# Altium PCB MainBoardPCB_BKP.PcbDoc (part 11 of 35)
Units mm, origin at the board's own origin, x right, y up, seen from the top; angles counter-clockwise.
Board outline 258.95 x 308.86 mm, 16 copper layers (L1, L2 (GND), L3 (Sign), L4 (GND), L5 (Sign), L6 (PWR/GND), L7(PWR/GND), L8 (Plane_GND), L9 (PWR/GND), L10 (PWR/GND), L11 (PWR/GND), L12 (Sign), L13 (GND), L14 (Sign), L15 (GND), L16), stack 2.502 mm thick; 2361 components, 1770 nets, 8410 pads, 3259 vias.
Unrouted connection lines stored in the file: 4700.
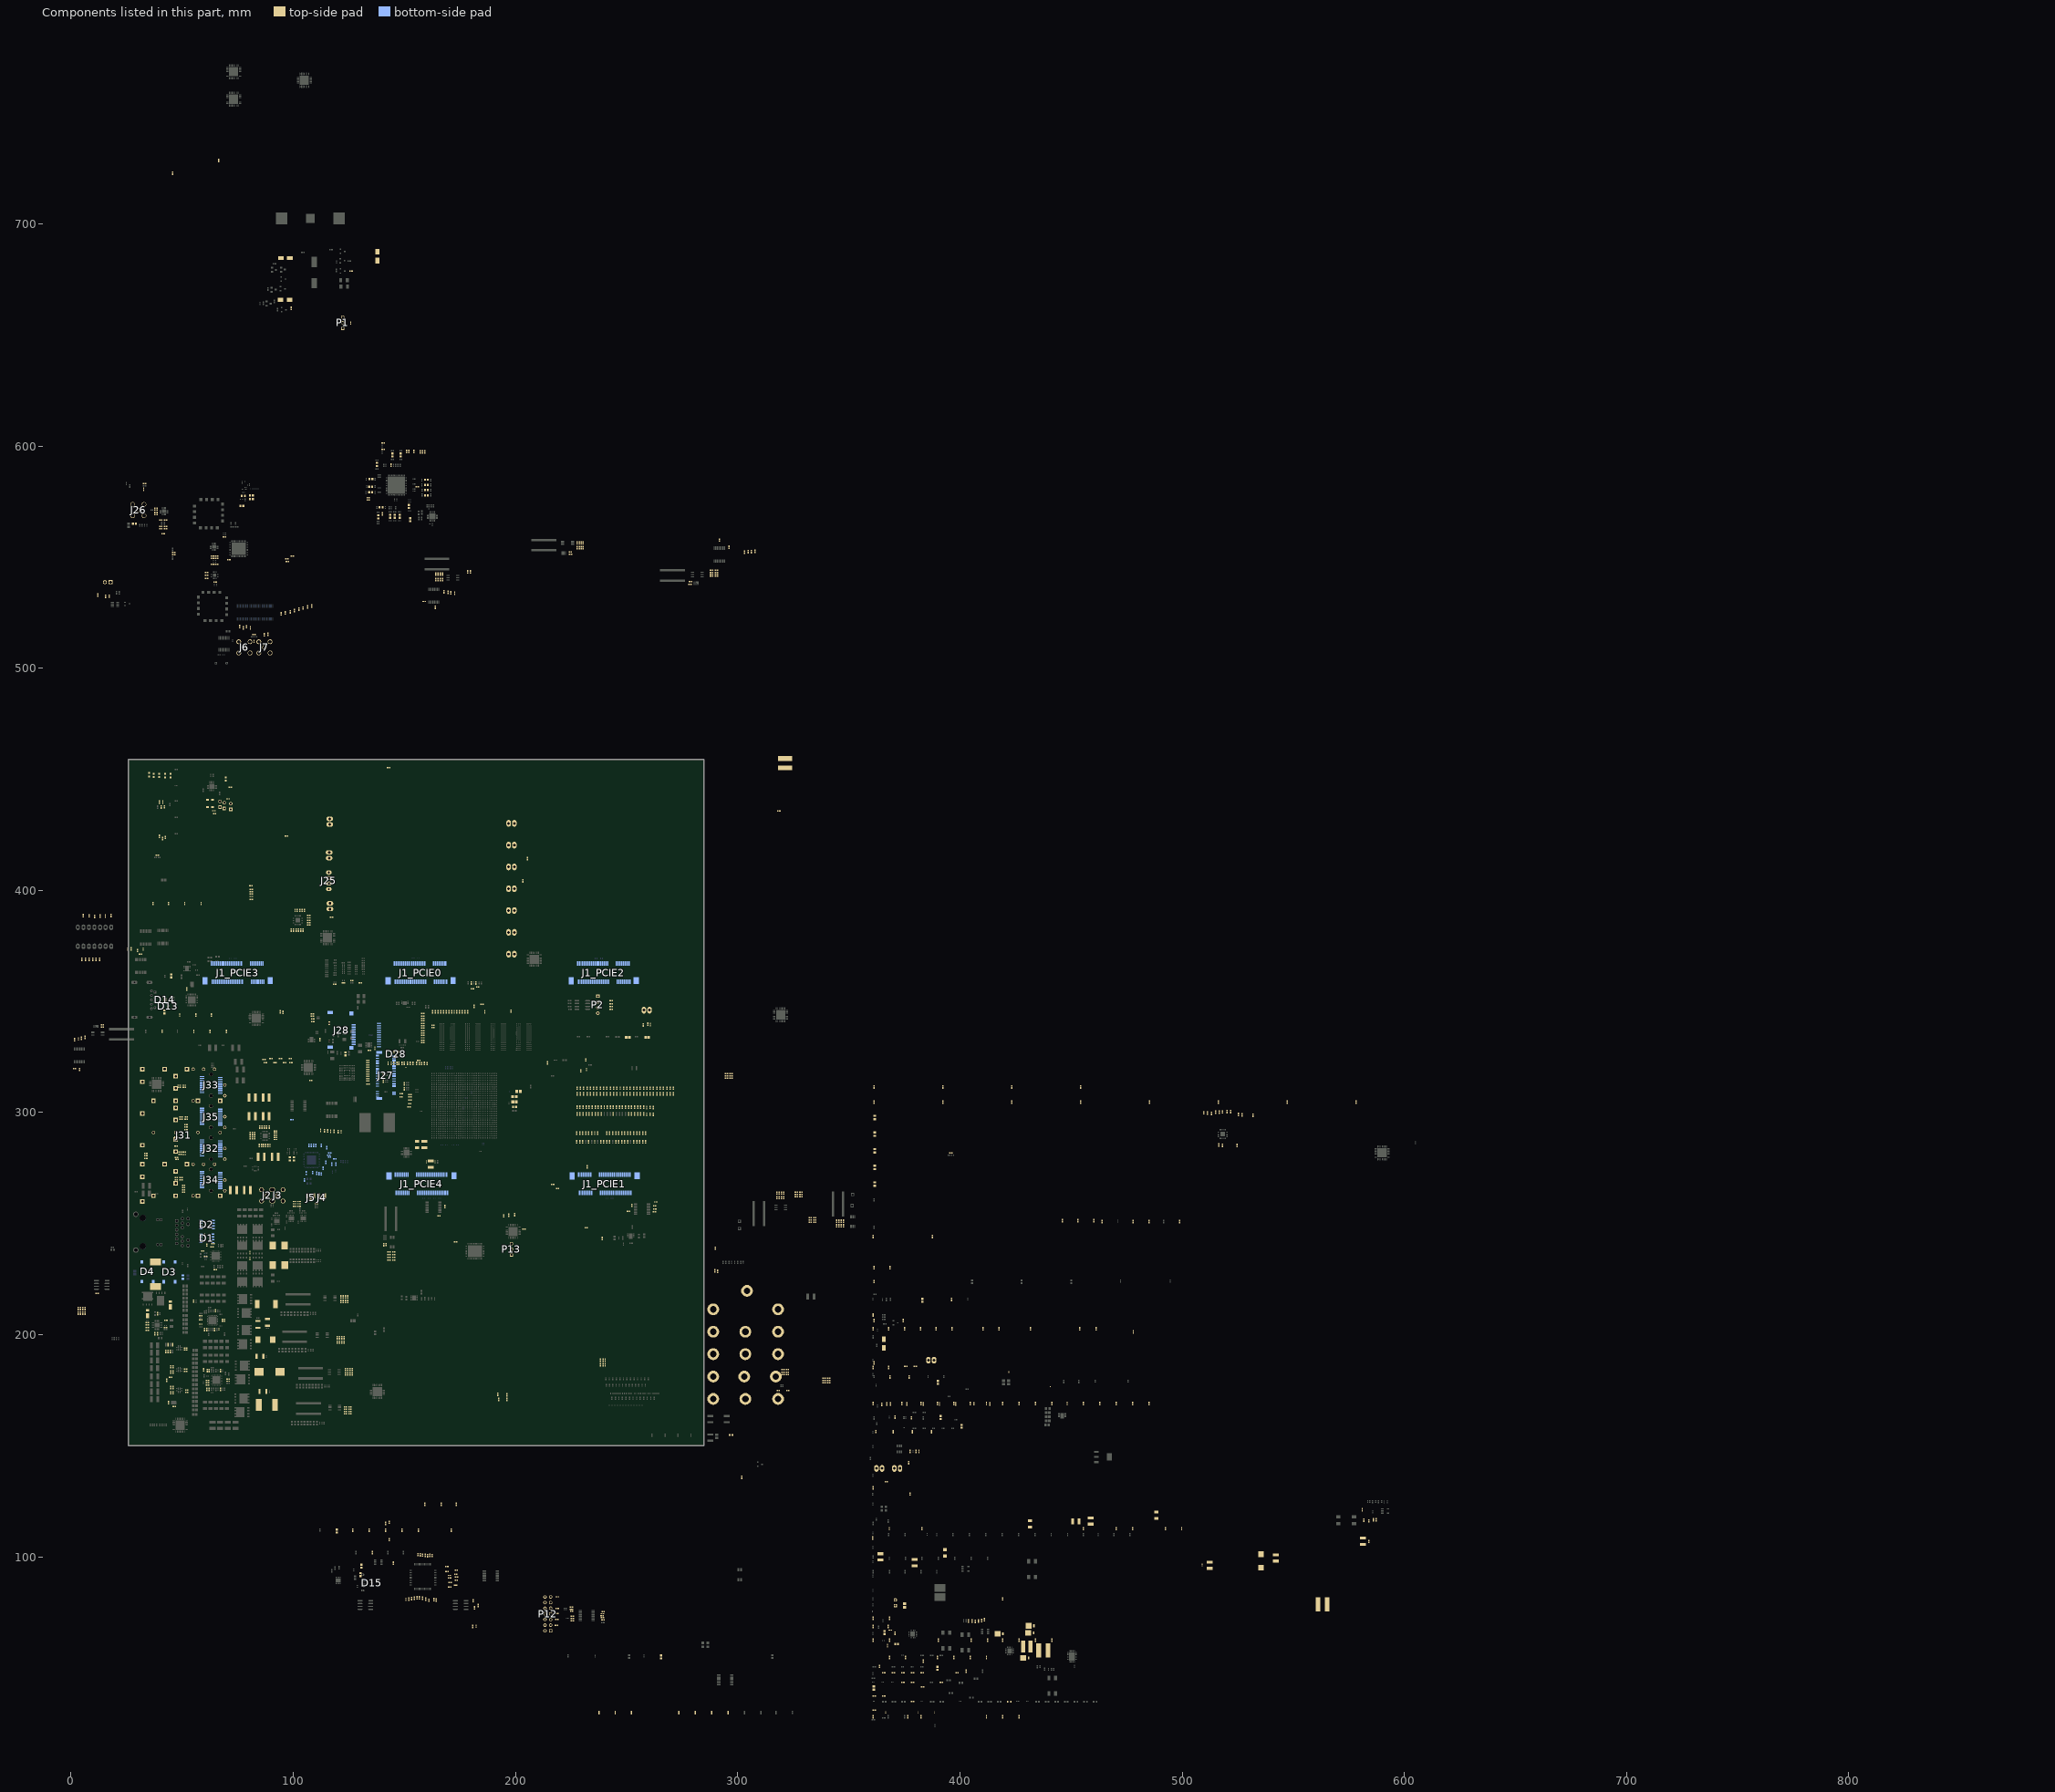
[diagram p20: the components of this part, seen from the top]

## Part data (continued)
C707 C708: library part Capacitor, "CAP CER 10UF 25V X5R 0805", Case/Package=0805, Case Code (Metric)=2012, Dielectric=X5R, Dielectric Material=Ceramic, Manufacturer=KEMET, Manufacturer Part Number=C0805C106K3PACTU, Max Operating Temperature=85°C, Min Operating Temperature=-55°C, Supplier Part Number 1=399-11939-6-ND, Tolerance=10%, Voltage=25V, Capacitance=10uF, Case Code (Imperial)=0805, Category="Ceramic Capacitors", ComponentLink1Description=http://www.farnell.com/datasheets/2741185.pdf?src-supplier=Farnell, ComponentLink1URL=http://www.farnell.com/datasheets/2741185.pdf?src-supplier=Farnell, ComponentLink2Description=http://www.farnell.com/datasheets/2112054.pdf?src-supplier=Farnell, ComponentLink2URL=http://www.farnell.com/datasheets/2112054.pdf?src-supplier=Farnell, ComponentLink3Description=http://www.alliedelec.com/m/d/f3c02ddb98afa3dd1adcb801109671e9.pdf?src-supplier=Allied+Electronics, ComponentLink3URL=http://www.alliedelec.com/m/d/f3c02ddb98afa3dd1adcb801109671e9.pdf?src-supplier=Allied+Electronics, ComponentLink4Description=http://www.farnell.com/datasheets/2112054.pdf?src-supplier=Element14, ComponentLink4URL=http://www.farnell.com/datasheets/2112054.pdf?src-supplier=Element14, ComponentLink5Description=https://api.kemet.com/component-edge/download/datasheet/C0805C106K3PAC7800.pdf?src-supplier=Digi-Key, ComponentLink5URL=https://api.kemet.com/component-edge/download/datasheet/C0805C106K3PAC7800.pdf?src-supplier=Digi-Key, ComponentLink6Description=http://www.kemet.com/docfinder?Partnumber=C0805C106K3PAC7800&src-supplier=Digi-Key, ComponentLink6URL=http://www.kemet.com/docfinder?Partnumber=C0805C106K3PAC7800&src-supplier=Digi-Key, ComponentLink7Description=http://www.kemet.com/Lists/ProductCatalog/Attachments/19/KEM_C1006_X5R_SMD.pdf?src-supplier=Avnet, ComponentLink7URL=http://www.kemet.com/Lists/ProductCatalog/Attachments/19/KEM_C1006_X5R_SMD.pdf?src-supplier=Avnet, Depth=1.25mm, Dissipation Factor=10%, Height=1.25mm, Lead Free="Lead Free", Length=0.079inch, Mount="Surface Mount", Packaging="Cut Tape", Pricing 1="1=0,24000, 10=0,16800, 100=0,09510, 500=0,06710, 1000=0,05872 (USD)", REACH SVHC="No SVHC", RoHS=Yes, Stock 1=4800, Supplier 1=Digi-Key, Termination=Solder, Thickness=0.057inch, Voltage Rating=25V, Voltage Rating (DC)=25V, Width=0.049inch
C714: library part Capacitor, "CAP CER 0.33UF 25V Y5V 0603", Case Code (Imperial)=0603, Case Code (Metric)=1608, Dielectric=Y5V, Dielectric Material=Ceramic, Manufacturer=KEMET, Manufacturer Part Number=C0603C334Z3VACTU, Max Operating Temperature=85°C, Min Operating Temperature=-30°C, Package Quantity=1, Supplier Part Number 1=399-1292-1-ND, Tolerance=80%, Voltage Rating=25V, Capacitance=330nF, Case/Package=0603, Category="Ceramic Capacitors", ComponentLink1Description=https://datasheet.ciiva.com/7378/1470417-7378528.pdf?src-supplier=Newark, ComponentLink1URL=https://datasheet.ciiva.com/7378/1470417-7378528.pdf?src-supplier=Newark, ComponentLink2Description=https://datasheet.ciiva.com/18193/getdatasheetpartid-220793-18193020.pdf?src-supplier=Verical, ComponentLink2URL=https://datasheet.ciiva.com/18193/getdatasheetpartid-220793-18193020.pdf?src-supplier=Verical, Depth=0.8mm, Dissipation Factor=7%, Height=0.8mm, Lead Free="Lead Free", Lead Pitch=0.7mm, Length=1.6mm, Mount="Surface Mount,PCB", Number of Pins=2, Packaging="Tape and Reel", Pricing 1="1=0,35000, 10=0,24500, 100=0,14720, 500=0,11044, 1000=0,09326 (USD)", Radiation Hardening=No, REACH SVHC="No SVHC", RoHS=Yes, Stock 1=11797, Supplier 1=Digi-Key, Termination=SMD/SMT, Thickness=0.035inch, Voltage Rating (DC)=25V, Width=0.031inch
C724 C725 C726 C727: library part Capacitor, Case/Package=0201, Case Code (Metric)=0603, Dielectric=X7R, Manufacturer=Yageo, Manufacturer Part Number=CC0201KRX7R7BB103, Max Operating Temperature=125°C, Min Operating Temperature=-55°C, Package Quantity=1, Supplier Part Number 1=311-1404-1-ND, Tolerance=10%, Voltage Rating=16V, Capacitance=10nF, Case Code (Imperial)=0201, ComponentLink1Description=https://datasheet.ciiva.com/13265/upy-gphc-x7r-6-3v-to-50v-8-12304-13265093.pdf?src-supplier=Mouser, ComponentLink1URL=https://datasheet.ciiva.com/13265/upy-gphc-x7r-6-3v-to-50v-8-12304-13265093.pdf?src-supplier=Mouser, ComponentLink2Description=https://datasheet.ciiva.com/176/mlccorderingcode-176522.pdf?src-supplier=Digi-Key, ComponentLink2URL=https://datasheet.ciiva.com/176/mlccorderingcode-176522.pdf?src-supplier=Digi-Key, ComponentLink3Description=https://datasheet.ciiva.com/176/mlccorderingcode-176523.pdf?src-supplier=Digi-Key, ComponentLink3URL=https://datasheet.ciiva.com/176/mlccorderingcode-176523.pdf?src-supplier=Digi-Key, ComponentLink4Description=https://datasheet.ciiva.com/176/mlccorderingcode-176524.pdf?src-supplier=Digi-Key, ComponentLink4URL=https://datasheet.ciiva.com/176/mlccorderingcode-176524.pdf?src-supplier=Digi-Key, Composition=Ceramic, Depth=0.3mm, Halogen Free="Halogen Free", Height=0.3mm, Lead Free="Lead Free", Length=0.6mm, Mount="Surface Mount", Packaging="Tape and Reel", Pricing 1="1 = 0,10000, 10 = 0,01900, 100 = 0,00830, 500 = 0,00592, 1000 = 0,00466, 2500 = 0,00424, 5000 = 0,00390 (USD)", RoHS=Yes, Stock 1=3220717, Supplier 1=Digi-Key, Termination=SMD/SMT, Thickness=0.013inch, Voltage Rating (DC)=16V, Weight=6E-06oz, Width=0.3mm
C731: library part Capacitor, Case/Package=0402, Case Code (Metric)=1005, Dielectric=X5R, Dielectric Material=Ceramic, Manufacturer=TDK, Manufacturer Part Number=C1005X5R1C225K050BC, Max Operating Temperature=85°C, Min Operating Temperature=-55°C, Package Quantity=1, Supplier Part Number 1=445-9085-1-ND, Tolerance=10%, Voltage Rating=16V, Capacitance=2.2uF, Case Code (Imperial)=0402, ComponentLink1Description=https://datasheet.ciiva.com/24216/c1005x5r1c225k050bc-264450-24216505.pdf?src-supplier=Mouser, ComponentLink1URL=https://datasheet.ciiva.com/24216/c1005x5r1c225k050bc-264450-24216505.pdf?src-supplier=Mouser, ComponentLink2Description=https://datasheet.ciiva.com/6275/tdkmlcccaprange-6275145.pdf?src-supplier=Digi-Key, ComponentLink2URL=https://datasheet.ciiva.com/6275/tdkmlcccaprange-6275145.pdf?src-supplier=Digi-Key, ComponentLink3Description=https://datasheet.ciiva.com/6275/tdkmlcccaprange-6275148.pdf?src-supplier=Digi-Key, ComponentLink3URL=https://datasheet.ciiva.com/6275/tdkmlcccaprange-6275148.pdf?src-supplier=Digi-Key, ComponentLink4Description=https://datasheet.ciiva.com/6275/tdkmlcccaprange-6275151.pdf?src-supplier=Digi-Key, ComponentLink4URL=https://datasheet.ciiva.com/6275/tdkmlcccaprange-6275151.pdf?src-supplier=Digi-Key, Composition=Ceramic, Depth=0.5mm, Height=0.5mm, Lead Free="Lead Free", Length=1mm, Mount="Surface Mount", Packaging="Tape and Reel", Pricing 1="1 = 0,38000, 10 = 0,25800, 100 = 0,14600, 500 = 0,10304, 1000 = 0,09016, 2500 = 0,08587, 5000 = 0,07943 (USD)", REACH SVHC="No SVHC", RoHS=Yes, Stock 1=441470, Supplier 1=Digi-Key, Termination=SMD/SMT, Thickness=0.022inch, Voltage Rating (DC)=16V, Weight=2.3E-05oz, Width=0.02inch
C736 C737: library part Capacitor, Case/Package=0201, Case Code (Metric)=0603, Manufacturer=Murata, Manufacturer Part Number=GRM0335C1E9R0CA01D, Max Operating Temperature=125°C, Min Operating Temperature=-55°C, Package Quantity=15000, Supplier Part Number 1=490-16718-1-ND, Voltage Rating=25V, Capacitance=9pF, Case Code (Imperial)=0201, ComponentLink1Description=https://datasheet.ciiva.com/29538/grm0335c1e9r0ca01-01-29538834.pdf?src-supplier=Digi-Key, ComponentLink1URL=https://datasheet.ciiva.com/29538/grm0335c1e9r0ca01-01-29538834.pdf?src-supplier=Digi-Key, Length=0.024inch, Mount="Surface Mount", Packaging="Tape and Reel", Pricing 1="1 = 0,10000, 10 = 0,01700, 100 = 0,00740, 500 = 0,00532, 1000 = 0,00417, 2500 = 0,00380, 5000 = 0,00349 (USD)", RoHS=Yes, Stock 1=29550, Supplier 1=Digi-Key, Termination=SMD/SMT, Thickness=0.013inch, Voltage Rating (DC)=25V, Width=0.012inch
C738: "CAP TANT POLY 680UF 6.3V 2917", Capacitance=680uF, Case/Package=2917, Case Code (Metric)=7343, ESR (Equivalent Series Resistance)=18mR, Leakage Current=428.4uA, Manufacturer=Panasonic, Max Operating Temperature=105°C, Min Operating Temperature=-55°C, Package Quantity=1, Ripple Current=3.5A, Supplier Part Number 1=P16633CT-ND, Tolerance=20%, Voltage=6.3V, Case Code (Imperial)=2917, ComponentLink1Description=https://datasheet.ciiva.com/24022/tpe-os-262406-24022136.pdf?src-supplier=Mouser, ComponentLink1URL=https://datasheet.ciiva.com/24022/tpe-os-262406-24022136.pdf?src-supplier=Mouser, ComponentLink2Description=https://datasheet.ciiva.com/26840/getdatasheetpartid-750514-26840938.pdf?src-supplier=Verical, ComponentLink2URL=https://datasheet.ciiva.com/26840/getdatasheetpartid-750514-26840938.pdf?src-supplier=Verical, ComponentLink3Description=https://datasheet.ciiva.com/22745/1734363-22745373.pdf?src-supplier=Element14, ComponentLink3URL=https://datasheet.ciiva.com/22745/1734363-22745373.pdf?src-supplier=Element14, ComponentLink4Description=https://datasheet.ciiva.com/25786/1734363-25786077.pdf?src-supplier=Farnell, ComponentLink4URL=https://datasheet.ciiva.com/25786/1734363-25786077.pdf?src-supplier=Farnell, Depth=4.3mm, Dissipation Factor=15%, Height=3.8mm, Height - Seated (Max)=0.157inch, Lead Free="Lead Free", Length=7.3mm, Manufacturer Part Number=6TPE680MI, Mount="Surface Mount", Number of Pins=4, Packaging="Tape and Reel", Polarity=Polar, Pricing 1="1 = 3,36000, 10 = 2,71700, 100 = 2,07450, 500 = 1,58056, 1000 = 1,38299 (USD)", Radiation Hardening=No, REACH SVHC="No SVHC", RoHS=Yes, Stock 1=3579, Supplier 1=Digi-Key, Termination=SMD/SMT, Voltage Rating=6.3V, Voltage Rating (DC)=6.3V, Width=0.169inch
C739 C742 C747 C751 C753 C757 C760 C762 C764: library part Capacitor, Case/Package=1210, Case Code (Metric)=3225, Dielectric=X7U, Manufacturer=Murata, Manufacturer Part Number=GRM32EE70G107ME19L, Max Operating Temperature=125°C, Min Operating Temperature=-55°C, Package Quantity=1, Supplier Part Number 1=490-6534-1-ND, Tolerance=20%, Voltage Rating=4V, Capacitance=100uF, Case Code (Imperial)=1210, ComponentLink1Description=https://datasheet.ciiva.com/5422/product-5422439.pdf?src-supplier=Mouser, ComponentLink1URL=https://datasheet.ciiva.com/5422/product-5422439.pdf?src-supplier=Mouser, ComponentLink2Description=https://datasheet.ciiva.com/6264/partnumbering-e-01-6264538.pdf?src-supplier=Digi-Key, ComponentLink2URL=https://datasheet.ciiva.com/6264/partnumbering-e-01-6264538.pdf?src-supplier=Digi-Key, ComponentLink3Description=https://datasheet.ciiva.com/7719/1303574-7719178.pdf?src-supplier=Element14, ComponentLink3URL=https://datasheet.ciiva.com/7719/1303574-7719178.pdf?src-supplier=Element14, ComponentLink4Description=https://datasheet.ciiva.com/6264/partnumbering-e-01-6264539.pdf?src-supplier=Digi-Key, ComponentLink4URL=https://datasheet.ciiva.com/6264/partnumbering-e-01-6264539.pdf?src-supplier=Digi-Key, ComponentLink5Description=https://datasheet.ciiva.com/14116/grmseries-highdielectrictype-eng-14116427.pdf?src-supplier=Distrelec, ComponentLink5URL=https://datasheet.ciiva.com/14116/grmseries-highdielectrictype-eng-14116427.pdf?src-supplier=Distrelec, ComponentLink6Description=https://datasheet.ciiva.com/6264/partnumbering-e-01-6264540.pdf?src-supplier=Digi-Key, ComponentLink6URL=https://datasheet.ciiva.com/6264/partnumbering-e-01-6264540.pdf?src-supplier=Digi-Key, ComponentLink7Description=https://datasheet.ciiva.com/11605/product-11605486.pdf?src-supplier=Avnet, ComponentLink7URL=https://datasheet.ciiva.com/11605/product-11605486.pdf?src-supplier=Avnet, Depth=2.5mm, Height=2.5mm, Lead Free="Lead Free", Lead Pitch=1mm, Length=3.2mm, Material=Ceramic, Mount="Surface Mount", Number of Pins=2, Packaging="Tape and Reel", Pricing 1="1 = 1,39000, 10 = 1,10100, 100 = 0,82570, 500 = 0,62386 (USD)", Radiation Hardening=No, REACH SVHC="No SVHC", RoHS=Yes, Stock 1=22860, Supplier 1=Digi-Key, Termination=SMD/SMT, Thickness=0.106inch, Voltage Rating (DC)=4V, Width=2.5mm
C740 C741 C743 C745 C746 C748 C750 C752 C754 C755 C758 C761 C763 C765: library part Capacitor, Case/Package=0402, Case Code (Metric)=1005, Manufacturer=Murata, Manufacturer Part Number=GRM155R61A475MEAAD, Max Operating Temperature=85°C, Min Operating Temperature=-55°C, Supplier Part Number 1=490-14306-1-ND, Tolerance=20%, Voltage Rating=10V, Capacitance=4.7uF, Case Code (Imperial)=0402, ComponentLink1Description=http://www.farnell.com/datasheets/2189109.pdf?src-supplier=Farnell, ComponentLink1URL=http://www.farnell.com/datasheets/2189109.pdf?src-supplier=Farnell, ComponentLink2Description=https://search.murata.co.jp/Ceramy/image/img/A01X/G101/ENG/GRM155R61A475MEAA-01.pdf?src-supplier=Digi-Key, ComponentLink2URL=https://search.murata.co.jp/Ceramy/image/img/A01X/G101/ENG/GRM155R61A475MEAA-01.pdf?src-supplier=Digi-Key, ComponentLink3Description=http://datasheet.octopart.com/GRM155R61A475MEAAD-Murata-datasheet-138740730.pdf?src-supplier=Ciiva+Crawler, ComponentLink3URL=http://datasheet.octopart.com/GRM155R61A475MEAAD-Murata-datasheet-138740730.pdf?src-supplier=Ciiva+Crawler, ComponentLink4Description=http://datasheet.octopart.com/GRM155R61A475MEAAD-Murata-datasheet-68589269.pdf?src-supplier=Newark, ComponentLink4URL=http://datasheet.octopart.com/GRM155R61A475MEAAD-Murata-datasheet-68589269.pdf?src-supplier=Newark, ComponentLink5Description=http://datasheet.octopart.com/GRM155R61A475MEAAD-Murata-datasheet-8819587.pdf, ComponentLink5URL=http://datasheet.octopart.com/GRM155R61A475MEAAD-Murata-datasheet-8819587.pdf, ComponentLink6Description=http://datasheet.octopart.com/GRM155R61A475MEAAD-Murata-datasheet-10025737.pdf, ComponentLink6URL=http://datasheet.octopart.com/GRM155R61A475MEAAD-Murata-datasheet-10025737.pdf, ComponentLink7Description=http://datasheet.octopart.com/GRM155R61A475MEAAD-Murata-datasheet-11978611.pdf, ComponentLink7URL=http://datasheet.octopart.com/GRM155R61A475MEAAD-Murata-datasheet-11978611.pdf, ComponentLink8Description=http://datasheet.octopart.com/GRM155R61A475MEAAD-Murata-datasheet-12510076.pdf, ComponentLink8URL=http://datasheet.octopart.com/GRM155R61A475MEAAD-Murata-datasheet-12510076.pdf, ComponentLink9Description=http://datasheet.octopart.com/GRM155R61A475MEAAD-Murata-datasheet-12515295.pdf, ComponentLink9URL=http://datasheet.octopart.com/GRM155R61A475MEAAD-Murata-datasheet-12515295.pdf, Mount="Surface Mount", Packaging="Tape and Reel", Pricing 1="1 = 0,25000, 10 = 0,16900, 100 = 0,08560, 500 = 0,05854, 1000 = 0,05179, 2500 = 0,04954, 5000 = 0,04503 (USD)", Stock 1=780543, Supplier 1=Digi-Key
C744 C749 C756 C759: library part Capacitor, Case/Package=1206, Case Code (Metric)=3216, Dielectric=X5R, Dielectric Material=Ceramic, Manufacturer=KEMET, Manufacturer Part Number=C1206C476M8PACTU, Max Operating Temperature=85°C, Min Operating Temperature=-55°C, Package Quantity=1, Supplier Part Number 1=399-5508-1-ND, Tolerance=20%, Voltage=10V, Capacitance=47uF, Case Code (Imperial)=1206, ComponentLink1Description=https://datasheet.ciiva.com/22705/1929483-22705482.pdf?src-supplier=Element14, ComponentLink1URL=https://datasheet.ciiva.com/22705/1929483-22705482.pdf?src-supplier=Element14, ComponentLink2Description=https://datasheet.ciiva.com/28608/1918694-28608743.pdf?src-supplier=Element14, ComponentLink2URL=https://datasheet.ciiva.com/28608/1918694-28608743.pdf?src-supplier=Element14, Contact Plating=Tin,Matte, Depth=1.6mm, Height=1.6mm, Lead Free="Lead Free", Length=3.2mm, Mount="Surface Mount,PCB", Number of Pins=2, Packaging="Tape and Reel", Pricing 1="1 = 0,96000, 10 = 0,72900, 100 = 0,52180, 500 = 0,40394, 1000 = 0,34784 (USD)", Radiation Hardening=No, REACH SVHC="No SVHC", RoHS=Yes, Stock 1=120241, Supplier 1=Digi-Key, Termination=SMD/SMT, Thickness=0.071inch, Voltage Rating=10V, Voltage Rating (DC)=10V, Width=1.6mm
C781: library part Capacitor, "CAP CER 4.7UF 25V X5R 0805", Case/Package=0805, Case Code (Metric)=2012, Dielectric=X5R, Manufacturer=Murata, Manufacturer Part Number=GRM219R61E475KA73D, Max Operating Temperature=85°C, Min Operating Temperature=-55°C, Package Quantity=4000, Supplier Part Number 1=490-12753-1-ND, Tolerance=10%, Voltage Rating=25V, Capacitance=4.7uF, Case Code (Imperial)=0805, Category="Ceramic Capacitors", ComponentLink1Description=http://www.mouser.com/ds/2/281/c02e-2905.pdf?src-supplier=Mouser, ComponentLink1URL=http://www.mouser.com/ds/2/281/c02e-2905.pdf?src-supplier=Mouser, ComponentLink2Description=http://search.murata.co.jp/Ceramy/image/img/A01X/partnumbering_e_01.pdf?src-supplier=Digi-Key, ComponentLink2URL=http://search.murata.co.jp/Ceramy/image/img/A01X/partnumbering_e_01.pdf?src-supplier=Digi-Key, ComponentLink3Description=http://search.murata.co.jp/Ceramy/image/img/A01X/G101/ENG/GRM219R61E475KA73-01.pdf?src-supplier=Digi-Key, ComponentLink3URL=http://search.murata.co.jp/Ceramy/image/img/A01X/G101/ENG/GRM219R61E475KA73-01.pdf?src-supplier=Digi-Key, Composition=Ceramic, Height=0.85mm, Length=2mm, Material=Ceramic, Mount="Surface Mount", Packaging="Tape and Reel", Pricing 1="1=0,30000, 10=0,20500, 100=0,11610, 500=0,08198, 1000=0,07173 (USD)", RoHS=Yes, Stock 1=21355, Supplier 1=Digi-Key, Termination=SMD/SMT, Thickness=0.037inch, Voltage Rating (DC)=25V, Weight=0.000335oz, Width=1.25mm
D1 D2: library part SLVU2.8-4BTG, "ESD Suppressor TVS ±30KV 8-Pin SOIC T/R", Breakdown Voltage=3V, Capacitance=2.5pF, Case/Package=SOIC, Clamping Voltage=15V, Leakage Current=1uA, Manufacturer=Littelfuse, Max Operating Temperature=85°C, Max Power Dissipation=600W, Min Operating Temperature=-40°C, Operating Supply Voltage=2.8V, Package Quantity=2500, Peak Pulse Current=40A, Power Line Protection=No, Supplier Part Number 1=F4206CT-ND, Category="TVS Diodes", ComponentLink1Description=https://datasheet.ciiva.com/4507/littelfuse-tvs-diode-array-slvu2-8-4-64488-4507717.pdf?src-supplier=Mouser, ComponentLink1URL=https://datasheet.ciiva.com/4507/littelfuse-tvs-diode-array-slvu2-8-4-64488-4507717.pdf?src-supplier=Mouser, ComponentLink2Description=https://datasheet.ciiva.com/6578/littelfusetvsdiodearrayslvu284-6578256.pdf?src-supplier=Digi-Key, ComponentLink2URL=https://datasheet.ciiva.com/6578/littelfusetvsdiodearrayslvu284-6578256.pdf?src-supplier=Digi-Key, ComponentLink3Description=https://datasheet.ciiva.com/15186/getdatasheetpartid-492857-15186609.pdf?src-supplier=Verical, ComponentLink3URL=https://datasheet.ciiva.com/15186/getdatasheetpartid-492857-15186609.pdf?src-supplier=Verical, ComponentLink4Description=https://datasheet.ciiva.com/6578/littelfuse-tvs-diode-array-slvu2-8-4-datasheet-pdf-6578252.pdf?src-supplier=Digi-Key, ComponentLink4URL=https://datasheet.ciiva.com/6578/littelfuse-tvs-diode-array-slvu2-8-4-datasheet-pdf-6578252.pdf?src-supplier=Digi-Key, ComponentLink5Description=https://datasheet.ciiva.com/6578/littelfuse-tvs-diode-array-slvu2-8-4-datasheet-pdf-6578255.pdf?src-supplier=Digi-Key, ComponentLink5URL=https://datasheet.ciiva.com/6578/littelfuse-tvs-diode-array-slvu2-8-4-datasheet-pdf-6578255.pdf?src-supplier=Digi-Key, Composition=Zener, Depth=4mm, Direction=Bidirectional,Unidirectional, Element Configuration=Dual, ESD Protection=Yes, Height=1.5mm, Lead Free="Lead Free", Length=5mm, Manufacturer Part Number=SLVU2.8-4BTG, Max Reverse Leakage Current=1uA, Min Breakdown Voltage=3V, Mount="Surface Mount", Number of Bidirectional Channels=4, Number of Channels=4, Number of Pins=8, Packaging="Tape and Reel", Peak Pulse Power=600W, Pricing 1="1=1,88000, 10=1,69200, 25=1,59640, 100=1,24530, 250=1,21336, 500=1,05370, 1000=0,89404 (USD)", Radiation Hardening=No, REACH SVHC="No SVHC", Reverse Standoff Voltage=2.8V, RoHS=Yes, Stock 1=7561, Supplier 1=Digi-Key, Termination=SMD/SMT, Width=4mm, Working Voltage=2.8V
D3 D4: "DIODE BRIDGE 100V 2A SDIP", Case/Package=SMD/SMT, Forward Current=2A, Forward Voltage=1.1V, Manufacturer="ON Semiconductor / Fairchild", Max Forward Surge Current (Ifsm)=85A, Max Operating Temperature=150°C, Max Repetitive Reverse Voltage (Vrrm)=100V, Min Operating Temperature=-55°C, Package Quantity=1500, Peak Reverse Current=3uA, Reverse Voltage (DC)=70V, Supplier Part Number 1=DF01S2CT-ND, Category=Uncategorized, ComponentLink1Description=http://www.mouser.com/ds/2/149/DF01S2-1006717.pdf?src-supplier=Mouser, ComponentLink1URL=http://www.mouser.com/ds/2/149/DF01S2-1006717.pdf?src-supplier=Mouser, ComponentLink2Description=https://www.fairchildsemi.com/datasheets/DF/DF005S2.pdf?src-supplier=Digi-Key, ComponentLink2URL=https://www.fairchildsemi.com/datasheets/DF/DF005S2.pdf?src-supplier=Digi-Key, ComponentLink3Description=https://www.fairchildsemi.com/datasheets/DF/DF01S2.pdf?src-supplier=Avnet, ComponentLink3URL=https://www.fairchildsemi.com/datasheets/DF/DF01S2.pdf?src-supplier=Avnet, Height=2.6mm, Length=8.51mm, Manufacturer Part Number=DF01S2, Max Surge Current=85A, Mount="Through Hole", Packaging="Tape and Reel", Pricing 1="1=0,57000, 10=0,50100, 25=0,47080, 100=0,34160, 250=0,32944, 500=0,28542 (USD)", RoHS=Yes, Stock 1=2215, Supplier 1=Digi-Key, Termination=SMD/SMT, Weight=0.484g, Width=6.5mm
D5 D6 D7 D8 D9 D10: "LED,  LTST-C190GKT", Case/Package=0603, Case Code (Metric)=1608, Color=Green, Forward Current=30mA, Forward Voltage=2.1V, Lens Color=Colorless, Manufacturer 1="Vishay Lite-On", Max Operating Temperature=85°C, Min Operating Temperature=-55°C, Package Quantity=1, Power Dissipation=100mW, Reverse Voltage=5V, Supplier Part Number 1=160-1183-1-ND, Test Current=10mA, Voltage=2V, Case Code (Imperial)=0603, ComponentLink1Description=https://datasheet.ciiva.com/11775/0900766b80dc02a6-11775616.pdf?src-supplier=RSComponents, ComponentLink1URL=https://datasheet.ciiva.com/11775/0900766b80dc02a6-11775616.pdf?src-supplier=RSComponents, ComponentLink2Description=https://datasheet.ciiva.com/2109/ltst-c190gkt-2109985.pdf?src-supplier=Digi-Key, ComponentLink2URL=https://datasheet.ciiva.com/2109/ltst-c190gkt-2109985.pdf?src-supplier=Digi-Key, ComponentLink3Description=https://datasheet.ciiva.com/16392/lite-on20ltst-c190gkt-16392818.pdf?src-supplier=Future+Electronics, ComponentLink3URL=https://datasheet.ciiva.com/16392/lite-on20ltst-c190gkt-16392818.pdf?src-supplier=Future+Electronics, ComponentLink4Description=https://datasheet.ciiva.com/12403/lite-on-ltst-c190gkt-187204-12403884.pdf?src-supplier=Mouser, ComponentLink4URL=https://datasheet.ciiva.com/12403/lite-on-ltst-c190gkt-187204-12403884.pdf?src-supplier=Mouser, ComponentLink5Description=https://datasheet.ciiva.com/2109/ltst-c190gkt-2109986.pdf?src-supplier=Digi-Key, ComponentLink5URL=https://datasheet.ciiva.com/2109/ltst-c190gkt-2109986.pdf?src-supplier=Digi-Key, ComponentLink6Description=https://datasheet.ciiva.com/2109/ltst-c190gkt-2109987.pdf?src-supplier=Digi-Key, ComponentLink6URL=https://datasheet.ciiva.com/2109/ltst-c190gkt-2109987.pdf?src-supplier=Digi-Key, Depth=0.8mm, Dominant Wavelength=569nm, Height=0.8mm, Illumination Color=Green, Lead Free="Lead Free", Length=1.6mm, Lens Style=Clear,Diffused,Colorless,Rectangular, Lens Transparency=Clear, Luminous Intensity=6mcd, Manufacturer Part Number 1=LTST-C190GKT, Mount="Surface Mount", Number of Elements=1, Number of LEDs=1, Number of Pins=2, Packaging="Tape and Reel", Power Rating=100mW, Pricing 1="1=0.26000, 10=0.18800, 100=0.08880, 500=0.05922, 1000=0.04639 (USD)", Radiation Hardening=No, RoHS=Yes, Stock 1=908158, Supplier 1=Digi-Key, Viewing Angle=130°, Wavelength=565nm, Width=0.8mm
D11 D12: "DIODE SCHOTTKY 30V 200MA SOD123", Average Rectified Current=200mA, Capacitance=10pF, Case/Package=SOD-123-2, Forward Voltage=350mV, Manufacturer="ON Semiconductor", Max Forward Surge Current (Ifsm)=600mA, Max Operating Temperature=125°C, Max Repetitive Reverse Voltage (Vrrm)=30V, Max Reverse Leakage Current=2uA, Min Operating Temperature=-55°C, Package Quantity=3000, Power Dissipation=400mW, Supplier Part Number 1=BAT54T1GOSCT-ND, Category="Rectifier Diodes", ComponentLink1Description=https://datasheet.ciiva.com/915/bat54t1-d-915482.pdf?src-supplier=Farnell, ComponentLink1URL=https://datasheet.ciiva.com/915/bat54t1-d-915482.pdf?src-supplier=Farnell, ComponentLink2Description=https://datasheet.ciiva.com/915/bat54t1-d-915482.pdf?src-supplier=Digi-Key, ComponentLink2URL=https://datasheet.ciiva.com/915/bat54t1-d-915482.pdf?src-supplier=Digi-Key, ComponentLink3Description=https://datasheet.ciiva.com/4714/bat54t1-d-108887-4714899.pdf?src-supplier=Mouser, ComponentLink3URL=https://datasheet.ciiva.com/4714/bat54t1-d-108887-4714899.pdf?src-supplier=Mouser, ComponentLink4Description=https://datasheet.ciiva.com/15144/getdatasheetpartid-39113-15144061.pdf?src-supplier=Verical, ComponentLink4URL=https://datasheet.ciiva.com/15144/getdatasheetpartid-39113-15144061.pdf?src-supplier=Verical, ComponentLink5Description=https://datasheet.ciiva.com/1180/bat54t1-d-1180308.pdf?src-supplier=Element14, ComponentLink5URL=https://datasheet.ciiva.com/1180/bat54t1-d-1180308.pdf?src-supplier=Element14, ComponentLink6Description=https://datasheet.ciiva.com/8299/bat54t1-d-8299989.pdf?src-supplier=Avnet, ComponentLink6URL=https://datasheet.ciiva.com/8299/bat54t1-d-8299989.pdf?src-supplier=Avnet, ComponentLink7Description=https://datasheet.ciiva.com/16475/bat54t1-d-16475623.pdf?src-supplier=Avnet+Asia, ComponentLink7URL=https://datasheet.ciiva.com/16475/bat54t1-d-16475623.pdf?src-supplier=Avnet+Asia, ComponentLink8Description=https://datasheet.ciiva.com/25950/bat54t1-d-25950154.pdf?src-supplier=Avnet+Europe, ComponentLink8URL=https://datasheet.ciiva.com/25950/bat54t1-d-25950154.pdf?src-supplier=Avnet+Europe, ComponentLink9Description=https://datasheet.ciiva.com/915/bat54t1-d-915483.pdf?src-supplier=Digi-Key, ComponentLink9URL=https://datasheet.ciiva.com/915/bat54t1-d-915483.pdf?src-supplier=Digi-Key, ComponentLink10Description=https://datasheet.ciiva.com/915/bat54t1-d-915484.pdf?src-supplier=Digi-Key, ComponentLink10URL=https://datasheet.ciiva.com/915/bat54t1-d-915484.pdf?src-supplier=Digi-Key, Contact Plating=Tin,Matte, Current Rating=200mA, Element Configuration=Single, Forward Current=200mA, Height=1.12mm, Lead Free="Lead Free", Length=2.69mm, Manufacturer Part Number=BAT54T1G, Max Reverse Voltage (DC)=30V, Max Surge Current=600mA, Number of Pins=2, Output Current=200mA, Packaging="Tape and Reel", Peak Non-Repetitive Surge Current=600mA, Peak Reverse Current=2uA, Polarity=Standard, Pricing 1="1=0,27000, 10=0,21700, 100=0,08880, 500=0,07410, 1000=0,05148 (USD)", Radiation Hardening=No, REACH SVHC="No SVHC", Recovery Time=5ns, Reverse Recovery Time=5ns, RoHS=Yes, Stock 1=20103, Supplier 1=Digi-Key, Termination=SMD/SMT, Voltage Rating (DC)=30V, Width=1.6mm
D13 D15: "TVS DIODE 5.5V 8V SOT3", Breakdown Voltage=9V, Capacitance=0.8pF, Case/Package=SOT, Clamping Voltage=8V, Manufacturer="Texas Instruments", Max Operating Temperature=85°C, Min Operating Temperature=-40°C, Package Quantity=1, Peak Pulse Current=1A, Peak Pulse Power=45W, Power Line Protection=Yes, Reverse Standoff Voltage=5.5V, Supplier Part Number 1=296-25509-1-ND, Test Current=1mA, Category="Interface ICs", ComponentLink1Description=https://datasheet.ciiva.com/1611/tpd2eusb30-1611602.pdf?src-supplier=Newark, ComponentLink1URL=https://datasheet.ciiva.com/1611/tpd2eusb30-1611602.pdf?src-supplier=Newark, ComponentLink2Description=https://datasheet.ciiva.com/15134/getdatasheetpartid-202713-15134479.pdf?src-supplier=Verical, ComponentLink2URL=https://datasheet.ciiva.com/15134/getdatasheetpartid-202713-15134479.pdf?src-supplier=Verical, ComponentLink3Description=https://datasheet.ciiva.com/26787/tpd2eusb30drtr-26787652.pdf?src-supplier=IIIC, ComponentLink3URL=https://datasheet.ciiva.com/26787/tpd2eusb30drtr-26787652.pdf?src-supplier=IIIC, ComponentLink4Description=https://datasheet.ciiva.com/353/tpd2eusb30-353272.pdf?src-supplier=Digi-Key, ComponentLink4URL=https://datasheet.ciiva.com/353/tpd2eusb30-353272.pdf?src-supplier=Digi-Key, ComponentLink5Description=https://datasheet.ciiva.com/1504/1882087-1504248.pdf?src-supplier=Element14, ComponentLink5URL=https://datasheet.ciiva.com/1504/1882087-1504248.pdf?src-supplier=Element14, ComponentLink6Description=https://datasheet.ciiva.com/353/tpd2eusb30-353273.pdf?src-supplier=Digi-Key, ComponentLink6URL=https://datasheet.ciiva.com/353/tpd2eusb30-353273.pdf?src-supplier=Digi-Key, ComponentLink7Description=https://datasheet.ciiva.com/25956/tpd4eusb30-25956841.pdf?src-supplier=Avnet+Europe, ComponentLink7URL=https://datasheet.ciiva.com/25956/tpd4eusb30-25956841.pdf?src-supplier=Avnet+Europe, ComponentLink8Description=https://datasheet.ciiva.com/353/tpd2eusb30-353274.pdf?src-supplier=Digi-Key, ComponentLink8URL=https://datasheet.ciiva.com/353/tpd2eusb30-353274.pdf?src-supplier=Digi-Key, Depth=0.8mm, Direction=Unidirectional,Bidirectional, Element Configuration=Dual, ESD Protection=Yes, Height=0.45mm, Interface=USB, Lead Free="Lead Free", Length=1mm, Manufacturer Part Number=TPD2EUSB30DRTR, Min Breakdown Voltage=9V, Number of Bidirectional Channels=2, Number of Channels=2, Number of Pins=3, Packaging="Tape and Reel", Pricing 1="1=0,58000, 10=0,49400, 25=0,46160, 100=0,34280, 250=0,32564, 500=0,26764, 1000=0,21754 (USD)", Radiation Hardening=No, REACH SVHC="No SVHC", RoHS=Yes, Stock 1=293674, Supplier 1=Digi-Key, Width=0.85mm, Working Voltage=5.5V
D14: "TVS DIODE 5.5V 8V 10SON", Breakdown Voltage=7V, Capacitance=0.8pF, Clamping Voltage=8V, Current Rating=5A, Manufacturer="Texas Instruments", Max Operating Temperature=85°C, Min Operating Temperature=-40°C, Package Quantity=1, Peak Pulse Current=1A, Peak Pulse Power=45W, Power Line Protection=Yes, Reverse Standoff Voltage=5.5V, Supplier Part Number 1=296-28063-1-ND, Category="TVS Diodes", ComponentLink1Description=https://datasheet.ciiva.com/339/tpd4eusb30-339202.pdf?src-supplier=Digi-Key, ComponentLink1URL=https://datasheet.ciiva.com/339/tpd4eusb30-339202.pdf?src-supplier=Digi-Key, ComponentLink2Description=https://datasheet.ciiva.com/41659/1634000-41659268.pdf?src-supplier=Farnell, ComponentLink2URL=https://datasheet.ciiva.com/41659/1634000-41659268.pdf?src-supplier=Farnell, ComponentLink3Description=https://datasheet.ciiva.com/15134/getdatasheetpartid-299321-15134669.pdf?src-supplier=Verical, ComponentLink3URL=https://datasheet.ciiva.com/15134/getdatasheetpartid-299321-15134669.pdf?src-supplier=Verical, ComponentLink4Description=https://datasheet.ciiva.com/339/tpd4eusb30-339204.pdf?src-supplier=Digi-Key, ComponentLink4URL=https://datasheet.ciiva.com/339/tpd4eusb30-339204.pdf?src-supplier=Digi-Key, ComponentLink5Description=https://datasheet.ciiva.com/1504/1882087-1504249.pdf?src-supplier=Element14, ComponentLink5URL=https://datasheet.ciiva.com/1504/1882087-1504249.pdf?src-supplier=Element14, ComponentLink6Description=https://datasheet.ciiva.com/339/tpd4eusb30-339203.pdf?src-supplier=Digi-Key, ComponentLink6URL=https://datasheet.ciiva.com/339/tpd4eusb30-339203.pdf?src-supplier=Digi-Key, ComponentLink7Description=https://datasheet.ciiva.com/22621/1882087-22621482.pdf?src-supplier=Element14, ComponentLink7URL=https://datasheet.ciiva.com/22621/1882087-22621482.pdf?src-supplier=Element14, Data Rate=6Gbps, Depth=1mm, Direction=Unidirectional, ESD Protection=Yes, Height=0.5mm, Interface=USB, Lead Free="Lead Free", Length=2.5mm, Manufacturer Part Number=TPD4EUSB30DQAR, Min Breakdown Voltage=8V, Number of Bidirectional Channels=4, Number of Channels=4, Number of Pins=10, Packaging="Tape and Reel", Pricing 1="1=0,81000, 10=0,71400, 25=0,67040, 100=0,48670, 250=0,46936, 500=0,40664, 1000=0,34608 (USD)", Radiation Hardening=No, REACH SVHC="No SVHC", RoHS=Yes, Stock 1=69157, Supplier 1=Digi-Key, Termination=SMD/SMT, Width=1.1mm, Working Voltage=5.5V
D16 D17 D18 D19: library part MBRM140T1G, Supplier Part Number 1=MBRM140T3GOSCT-ND, Supplier 1=Digi-Key
D20 D21 D23 D24: "DIODE GEN PURP 1KV 1A SMA", Average Rectified Current=1A, Capacitance=10pF, Case/Package=SMA, Forward Voltage="Vf = 1.1V", Manufacturer=Diodes, Max Forward Surge Current (Ifsm)=30A, Max Operating Temperature=150°C, Max Repetitive Reverse Voltage (Vrrm)=1kV, Min Operating Temperature=-65°C, Package Quantity=5000, Peak Reverse Current=5uA, Supplier Part Number 1=S1M-FDICT-ND, Category="Rectifier Diodes", ComponentLink1Description=https://datasheet.ciiva.com/34302/1541642-34302418.pdf?src-supplier=Jameco, ComponentLink1URL=https://datasheet.ciiva.com/34302/1541642-34302418.pdf?src-supplier=Jameco, ComponentLink2Description=https://datasheet.ciiva.com/22695/1911706-22695834.pdf?src-supplier=Element14, ComponentLink2URL=https://datasheet.ciiva.com/22695/1911706-22695834.pdf?src-supplier=Element14, Current Rating=1A, Forward Current=1A, Height=2.1mm, Lead Free="Lead Free", Length=4.6mm, Manufacturer Part Number=S1M-13-F, Max Reverse Voltage (DC)=1kV, Number of Pins=2, Output Current=1A, Packaging="Tape and Reel", Peak Non-Repetitive Surge Current=30A, Polarity=Standard, Pricing 1="1=0,25000, 10=0,20100, 25=0,16840, 100=0,08240, 250=0,08104, 500=0,06870, 1000=0,04774, 2500=0,04437 (USD)", Radiation Hardening=No, REACH SVHC="No SVHC", Recovery Time=1.8us, Reverse Recovery Time=3us, Reverse Voltage (DC)=1kV, RoHS=Yes, Stock 1=1021310, Supplier 1=Digi-Key, Termination=SMD/SMT, Voltage Rating (DC)=1kV, Weight=0.002258oz, Width=2.92mm
D26 D27: "DIODE SCHOTTKY 100V POWERDI123", Average Rectified Current=1A, Capacitance=36pF, Forward Voltage=770mV, Manufacturer=Diodes, Max Forward Surge Current (Ifsm)=40A, Max Operating Temperature=175°C, Max Repetitive Reverse Voltage (Vrrm)=100V, Min Operating Temperature=-55°C, Package Quantity=3000, Peak Non-Repetitive Surge Current=50A, Peak Reverse Current=1uA, Supplier Part Number 1=DFLS1100DICT-ND, Category="Rectifier Diodes", ComponentLink1Description=https://datasheet.ciiva.com/6932/ds30497-6932064.pdf?src-supplier=Newark, ComponentLink1URL=https://datasheet.ciiva.com/6932/ds30497-6932064.pdf?src-supplier=Newark, ComponentLink2Description=https://datasheet.ciiva.com/4715/ds30497-81105-4715653.pdf?src-supplier=Mouser, ComponentLink2URL=https://datasheet.ciiva.com/4715/ds30497-81105-4715653.pdf?src-supplier=Mouser, ComponentLink3Description=https://datasheet.ciiva.com/4245/2460ds30497-4245287.pdf?src-supplier=Arrow, ComponentLink3URL=https://datasheet.ciiva.com/4245/2460ds30497-4245287.pdf?src-supplier=Arrow, ComponentLink4Description=https://datasheet.ciiva.com/15144/getdatasheetpartid-44146-15144126.pdf?src-supplier=Verical, ComponentLink4URL=https://datasheet.ciiva.com/15144/getdatasheetpartid-44146-15144126.pdf?src-supplier=Verical, ComponentLink5Description=https://datasheet.ciiva.com/26788/dfls1100-7-26788776.pdf?src-supplier=IIIC, ComponentLink5URL=https://datasheet.ciiva.com/26788/dfls1100-7-26788776.pdf?src-supplier=IIIC, ComponentLink6Description=https://datasheet.ciiva.com/914/ds30497-914548.pdf?src-supplier=Digi-Key, ComponentLink6URL=https://datasheet.ciiva.com/914/ds30497-914548.pdf?src-supplier=Digi-Key, ComponentLink7Description=https://datasheet.ciiva.com/914/ds30497-914549.pdf?src-supplier=Digi-Key, ComponentLink7URL=https://datasheet.ciiva.com/914/ds30497-914549.pdf?src-supplier=Digi-Key, ComponentLink8Description=https://datasheet.ciiva.com/914/ds30497-914550.pdf?src-supplier=Digi-Key, ComponentLink8URL=https://datasheet.ciiva.com/914/ds30497-914550.pdf?src-supplier=Digi-Key, ComponentLink9Description=https://datasheet.ciiva.com/7964/ds30497-7964246.pdf?src-supplier=Element14, ComponentLink9URL=https://datasheet.ciiva.com/7964/ds30497-7964246.pdf?src-supplier=Element14, ComponentLink10Description=https://datasheet.ciiva.com/22695/1915475-22695803.pdf?src-supplier=Element14, ComponentLink10URL=https://datasheet.ciiva.com/22695/1915475-22695803.pdf?src-supplier=Element14, Current Rating=1A, Element Configuration=Single, Forward Current=1A, Height=0.98mm, Lead Free="Lead Free", Length=2.8mm, Manufacturer Part Number=DFLS1100-7, Max Reverse Voltage (DC)=100V, Mount="Surface Mount", Number of Pins=2, Output Current=1A, Packaging="Tape and Reel", Polarity=Standard, Pricing 1="1=0,41000, 10=0,35100, 25=0,32760, 100=0,24340, 250=0,23120, 500=0,19000, 1000=0,15444 (USD)", Radiation Hardening=No, REACH SVHC="No SVHC", RoHS=Yes, Stock 1=113187, Supplier 1=Digi-Key, Termination=SMD/SMT, Voltage Rating (DC)=100V, Width=1.78mm
D28: "DIODE ARRAY SCHOTTKY 40V SOT23", Average Rectified Current=200mA, Capacitance=5pF, Case/Package=SOT-23, Forward Voltage=1V, Manufacturer=MCC, Max Forward Surge Current (Ifsm)=600mA, Max Operating Temperature=125°C, Max Repetitive Reverse Voltage (Vrrm)=40V, Max Reverse Leakage Current=200nA, Min Operating Temperature=-55°C, Package Quantity=3000, Power Dissipation=200mW, Supplier Part Number 1=BAS40-04TPMSCT-ND, ComponentLink1Description=https://datasheet.ciiva.com/23684/1684803-23684306.pdf?src-supplier=Newark, ComponentLink1URL=https://datasheet.ciiva.com/23684/1684803-23684306.pdf?src-supplier=Newark, ComponentLink2Description=https://datasheet.ciiva.com/4716/bas40-bas70sot-23-28891-4716000.pdf?src-supplier=Mouser, ComponentLink2URL=https://datasheet.ciiva.com/4716/bas40-bas70sot-23-28891-4716000.pdf?src-supplier=Mouser, ComponentLink3Description=https://datasheet.ciiva.com/906/bas40-bas70sot-23-906320.pdf?src-supplier=Digi-Key, ComponentLink3URL=https://datasheet.ciiva.com/906/bas40-bas70sot-23-906320.pdf?src-supplier=Digi-Key, ComponentLink4Description=https://datasheet.ciiva.com/15200/getdatasheetpartid-226544-15200426.pdf?src-supplier=Verical, ComponentLink4URL=https://datasheet.ciiva.com/15200/getdatasheetpartid-226544-15200426.pdf?src-supplier=Verical, ComponentLink5Description=https://datasheet.ciiva.com/7624/1684803-7624699.pdf?src-supplier=Element14, ComponentLink5URL=https://datasheet.ciiva.com/7624/1684803-7624699.pdf?src-supplier=Element14, ComponentLink6Description=https://datasheet.ciiva.com/906/bas40-bas70sot-23-906318.pdf?src-supplier=Digi-Key, ComponentLink6URL=https://datasheet.ciiva.com/906/bas40-bas70sot-23-906318.pdf?src-supplier=Digi-Key, ComponentLink7Description=https://datasheet.ciiva.com/906/bas40-bas70sot-23-906319.pdf?src-supplier=Digi-Key, ComponentLink7URL=https://datasheet.ciiva.com/906/bas40-bas70sot-23-906319.pdf?src-supplier=Digi-Key, Element Configuration=Single, Forward Current=200mA, Height=1.02mm, Lead Free="Lead Free", Length=3.04mm, Manufacturer Part Number=BAS40-04-TP, Max Reverse Voltage (DC)=40V, Max Surge Current=600mA, Mount="Surface Mount", Number of Pins=3, Packaging="Tape and Reel", Peak Non-Repetitive Surge Current=600mA, Peak Reverse Current=200nA, Pricing 1="1 = 0,39000, 10 = 0,28800, 25 = 0,25240, 100 = 0,13700, 250 = 0,13628, 500 = 0,11176, 1000 = 0,08292 (USD)", Radiation Hardening=No, REACH SVHC=Unknown, Recovery Time=5ns, Reverse Recovery Time=5ns, RoHS=Yes, Stock 1=1204011, Supplier 1=Digi-Key, Width=1.4mm
F1_PCIE0 F1_PCIE1 F1_PCIE2 F1_PCIE3 F1_PCIE4: library part Resistor, "Fast fuse"
FB2 FB3 FB4 FB5 FB6 FB7 FB35: library part "Ferrite Chip", "SMT Ferrite Chip", Part Number=CIS10P221NC, Supplier Part Number 1=1276-6350-1-ND, Supplier 1=Digi-Key
FB8 FB9 FB10 FB11 FB12 FB13 FB14 FB15 FB16 FB17 FB18 FB19 FB20 FB21 FB22 FB36 FB37: library part Ferrite, "FERRITE BEAD 220 OHM 0603 1LN", Case Code (Imperial)=0603, Case Code (Metric)=1608, Current Rating=2.5A, DC Resistance (DCR)=40mR, Manufacturer=Murata, Manufacturer Part Number=BLM18SG221TN1D, Max Operating Temperature=125°C, Min Operating Temperature=-55°C, Package Quantity=1, Supplier Part Number 1=490-5225-1-ND, Test Frequency=100MHz, Tolerance=25%, Case/Package=0603, Category=Inductors, ComponentLink1Description=https://datasheet.ciiva.com/1561/c31e-1561456.pdf?src-supplier=Newark, ComponentLink1URL=https://datasheet.ciiva.com/1561/c31e-1561456.pdf?src-supplier=Newark, ComponentLink2Description=https://datasheet.ciiva.com/41449/001171724-da-01-en-chip-drossel0603-220r-2500ma-1-6x0-8mm-41449352.pdf?src-supplier=Conrad, ComponentLink2URL=https://datasheet.ciiva.com/41449/001171724-da-01-en-chip-drossel0603-220r-2500ma-1-6x0-8mm-41449352.pdf?src-supplier=Conrad, ComponentLink3Description=https://datasheet.ciiva.com/41449/001172313-da-01-en-drossel-0603-220r-21-6x0-8mm-10000st-41449677.pdf?src-supplier=Conrad, ComponentLink3URL=https://datasheet.ciiva.com/41449/001172313-da-01-en-drossel-0603-220r-21-6x0-8mm-10000st-41449677.pdf?src-supplier=Conrad, ComponentLink4Description=https://datasheet.ciiva.com/1012/l0110s0100blm18s-1012626.pdf?src-supplier=Digi-Key, ComponentLink4URL=https://datasheet.ciiva.com/1012/l0110s0100blm18s-1012626.pdf?src-supplier=Digi-Key, ComponentLink5Description=https://datasheet.ciiva.com/1012/l0110s0100blm18s-1012627.pdf?src-supplier=Digi-Key, ComponentLink5URL=https://datasheet.ciiva.com/1012/l0110s0100blm18s-1012627.pdf?src-supplier=Digi-Key, ComponentLink6Description=https://datasheet.ciiva.com/1012/l0110s0100blm18s-1012628.pdf?src-supplier=Digi-Key, ComponentLink6URL=https://datasheet.ciiva.com/1012/l0110s0100blm18s-1012628.pdf?src-supplier=Digi-Key, ComponentLink7Description=https://datasheet.ciiva.com/17279/l0110s0100blm18s-17279573.pdf?src-supplier=Avnet+Europe, ComponentLink7URL=https://datasheet.ciiva.com/17279/l0110s0100blm18s-17279573.pdf?src-supplier=Avnet+Europe, ComponentLink8Description=https://datasheet.ciiva.com/8508/l0110s0100blm18s-8508310.pdf?src-supplier=Avnet, ComponentLink8URL=https://datasheet.ciiva.com/8508/l0110s0100blm18s-8508310.pdf?src-supplier=Avnet, ComponentLink9Description=https://datasheet.ciiva.com/8021/5151-8021517.pdf?src-supplier=Element14, ComponentLink9URL=https://datasheet.ciiva.com/8021/5151-8021517.pdf?src-supplier=Element14, ComponentLink10Description=https://datasheet.ciiva.com/16204/l0110s0100blm18s-16204029.pdf?src-supplier=Future+Electronics, ComponentLink10URL=https://datasheet.ciiva.com/16204/l0110s0100blm18s-16204029.pdf?src-supplier=Future+Electronics, ComponentLink11Description=https://datasheet.ciiva.com/14122/blm-series-eng-tds-14122910.pdf?src-supplier=Distrelec, ComponentLink11URL=https://datasheet.ciiva.com/14122/blm-series-eng-tds-14122910.pdf?src-supplier=Distrelec, ComponentLink12Description=https://datasheet.ciiva.com/8021/5151-8021519.pdf?src-supplier=Element14, ComponentLink12URL=https://datasheet.ciiva.com/8021/5151-8021519.pdf?src-supplier=Element14, Core Material=Ferrite, DC Current=2.5A, Depth=0.95mm, Height=0.8mm, Impedance=220R, Lead Free="Lead Free", Length=1.6mm, Material=Ferrite,Steel, Max Current Rating=2.5A, Max DC Current=2.5A, Number of Circuits=1, Number of Lines=1, Number of Pins=2, Packaging="Tape and Reel", Pricing 1="1=0,14000, 10=0,11600, 25=0,09040, 50=0,07500, 100=0,06460, 250=0,05172, 500=0,04654, 1000=0,03878, 5000=0,03619 (USD)", Radiation Hardening=No, REACH SVHC="No SVHC", RoHS=Yes, Stock 1=123623, Supplier 1=Digi-Key, Termination=SMD/SMT, Weight=7.1E-05oz, Width=0.8mm
FB23 FB25: "SMT Ferrite Chip", Case/Package=0603, Case Code (Metric)=1608, Current Rating=1.7A, DC Resistance (DCR)=80mR, Manufacturer=TDK, Manufacturer Part Number=MPZ1608S331ATA00, Package Quantity=1, Supplier Part Number 1=445-5221-1-ND, Tolerance=25%, Case Code (Imperial)=0603, ComponentLink1Description=https://datasheet.ciiva.com/46634/beads-commercial-power-mpz-en-46634727.pdf?src-supplier=Digi-Key, ComponentLink1URL=https://datasheet.ciiva.com/46634/beads-commercial-power-mpz-en-46634727.pdf?src-supplier=Digi-Key, ComponentLink2Description=https://datasheet.ciiva.com/46634/beads-commercial-power-mpz-en-46634696.pdf?src-supplier=Digi-Key, ComponentLink2URL=https://datasheet.ciiva.com/46634/beads-commercial-power-mpz-en-46634696.pdf?src-supplier=Digi-Key, ComponentLink3Description=https://datasheet.ciiva.com/46634/beads-commercial-power-mpz-en-46634731.pdf?src-supplier=Digi-Key, ComponentLink3URL=https://datasheet.ciiva.com/46634/beads-commercial-power-mpz-en-46634731.pdf?src-supplier=Digi-Key, Core Material=Ferrite, Height=0.037inch, Impedance=330R, Lead Free="Lead Free", Length=0.063inch, Max DC Current=1.7A, Mount="Surface Mount", Packaging="Tape and Reel", Pricing 1="1 = 0,10000, 10 = 0,07900, 25 = 0,07160, 50 = 0,06440, 100 = 0,04720, 250 = 0,03432, 500 = 0,03146, 1000 = 0,02717 (USD)", REACH SVHC="No SVHC", RoHS=Yes, Stock 1=117126, Supplier 1=Digi-Key, Width=0.031inch
FB24: "SMT Ferrite Chip", Case Code (Imperial)=0603, Case Code (Metric)=1608, Current Rating=1.7A, DC Resistance (DCR)=80mR, Manufacturer=TDK, Manufacturer Part Number=MPZ1608S331ATA00, Package Quantity=1, Supplier Part Number 1=445-5221-1-ND, Tolerance=25%, Case/Package=0603, ComponentLink1Description=https://datasheet.ciiva.com/46634/beads-commercial-power-mpz-en-46634727.pdf?src-supplier=Digi-Key, ComponentLink1URL=https://datasheet.ciiva.com/46634/beads-commercial-power-mpz-en-46634727.pdf?src-supplier=Digi-Key, ComponentLink2Description=https://datasheet.ciiva.com/46634/beads-commercial-power-mpz-en-46634696.pdf?src-supplier=Digi-Key, ComponentLink2URL=https://datasheet.ciiva.com/46634/beads-commercial-power-mpz-en-46634696.pdf?src-supplier=Digi-Key, ComponentLink3Description=https://datasheet.ciiva.com/46634/beads-commercial-power-mpz-en-46634731.pdf?src-supplier=Digi-Key, ComponentLink3URL=https://datasheet.ciiva.com/46634/beads-commercial-power-mpz-en-46634731.pdf?src-supplier=Digi-Key, Core Material=Ferrite, Height=0.037inch, Impedance=330R, Lead Free="Lead Free", Length=0.063inch, Max DC Current=1.7A, Mount="Surface Mount", Packaging="Tape and Reel", Pricing 1="1 = 0,10000, 10 = 0,07900, 25 = 0,07160, 50 = 0,06440, 100 = 0,04720, 250 = 0,03432, 500 = 0,03146, 1000 = 0,02717 (USD)", REACH SVHC="No SVHC", RoHS=Yes, Stock 1=117126, Supplier 1=Digi-Key, Width=0.031inch